# Altium PCB AT-kdFCU.PcbDoc (part 1 of 2)
Units mm, origin at the board's own origin, x right, y up, seen from the top; angles counter-clockwise.
Board outline 40 x 40 mm, 4 copper layers (Top Layer, GND, POWER, Bottom Layer), stack 0.603 mm thick; 137 components, 117 nets, 527 pads, 186 vias.
Unrouted connection lines stored in the file: 1.
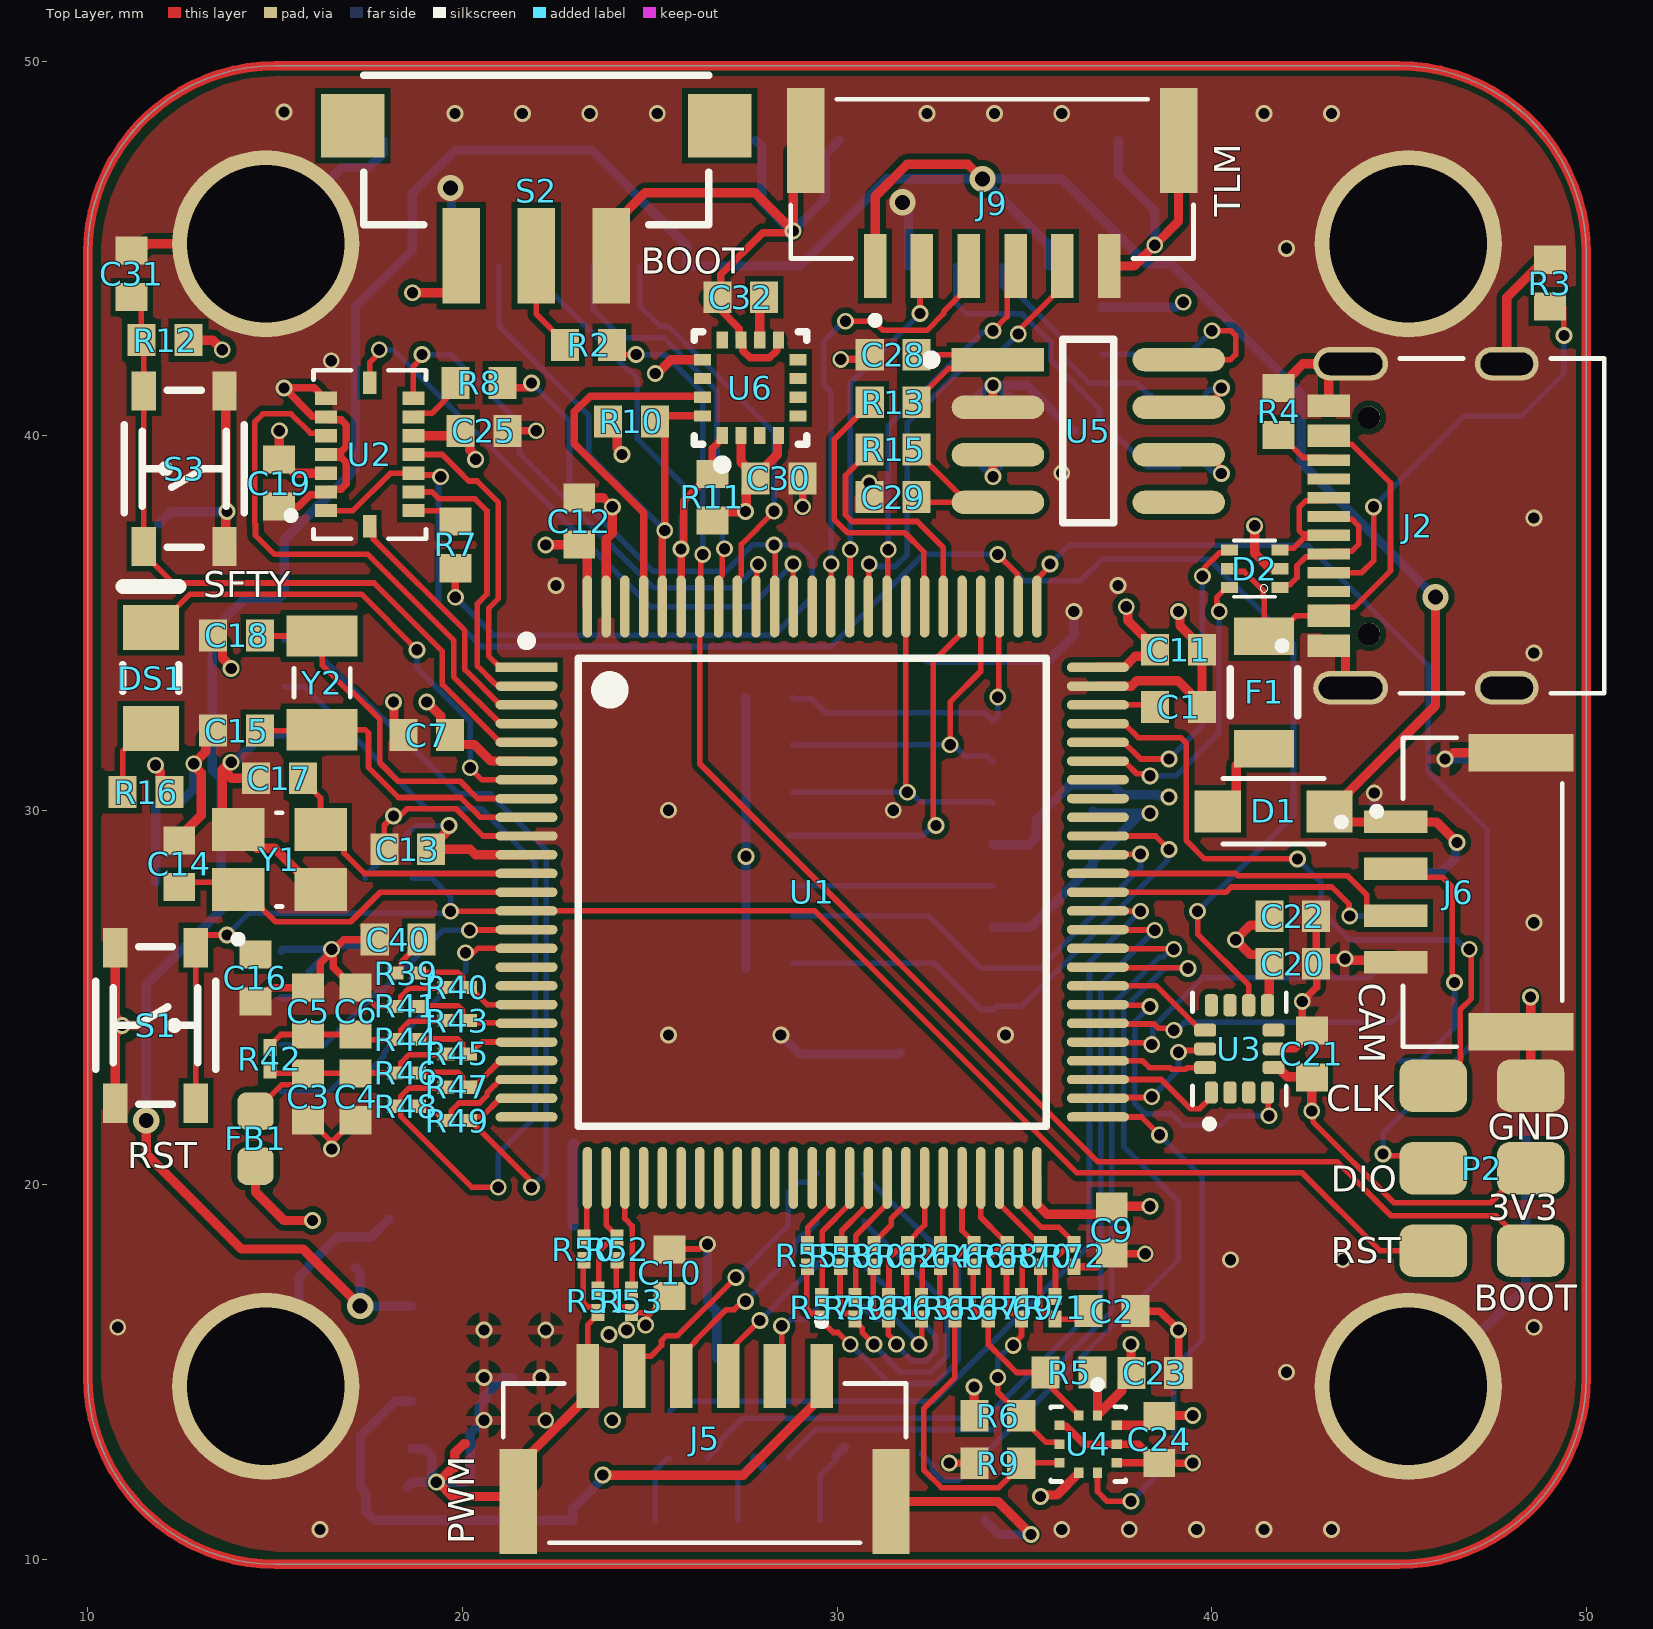
[diagram p0: Top Layer view]
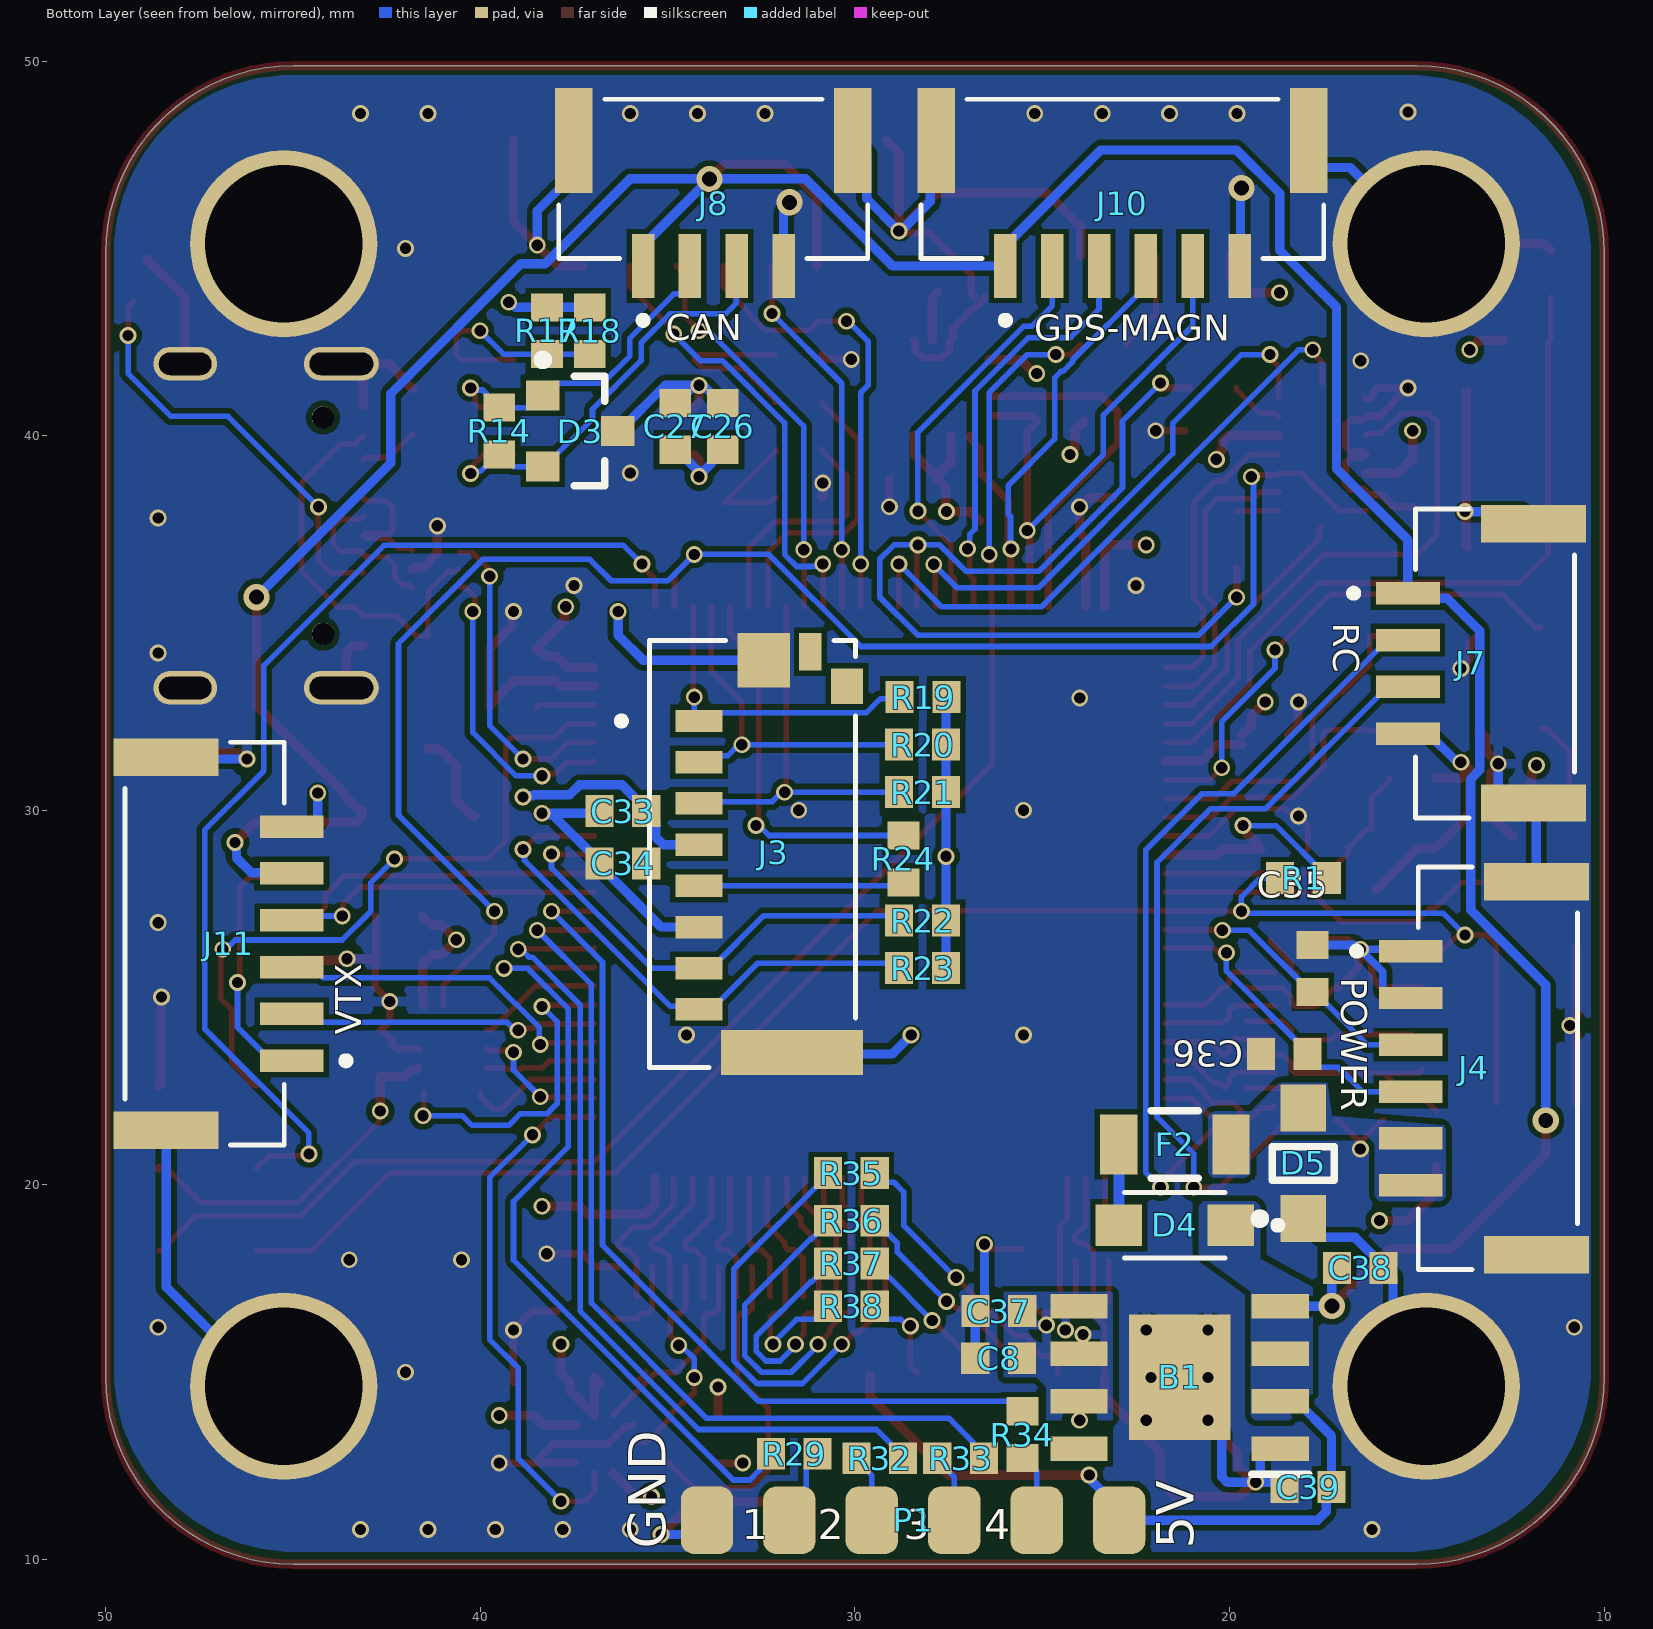
[diagram p1: Bottom Layer view, seen from below]
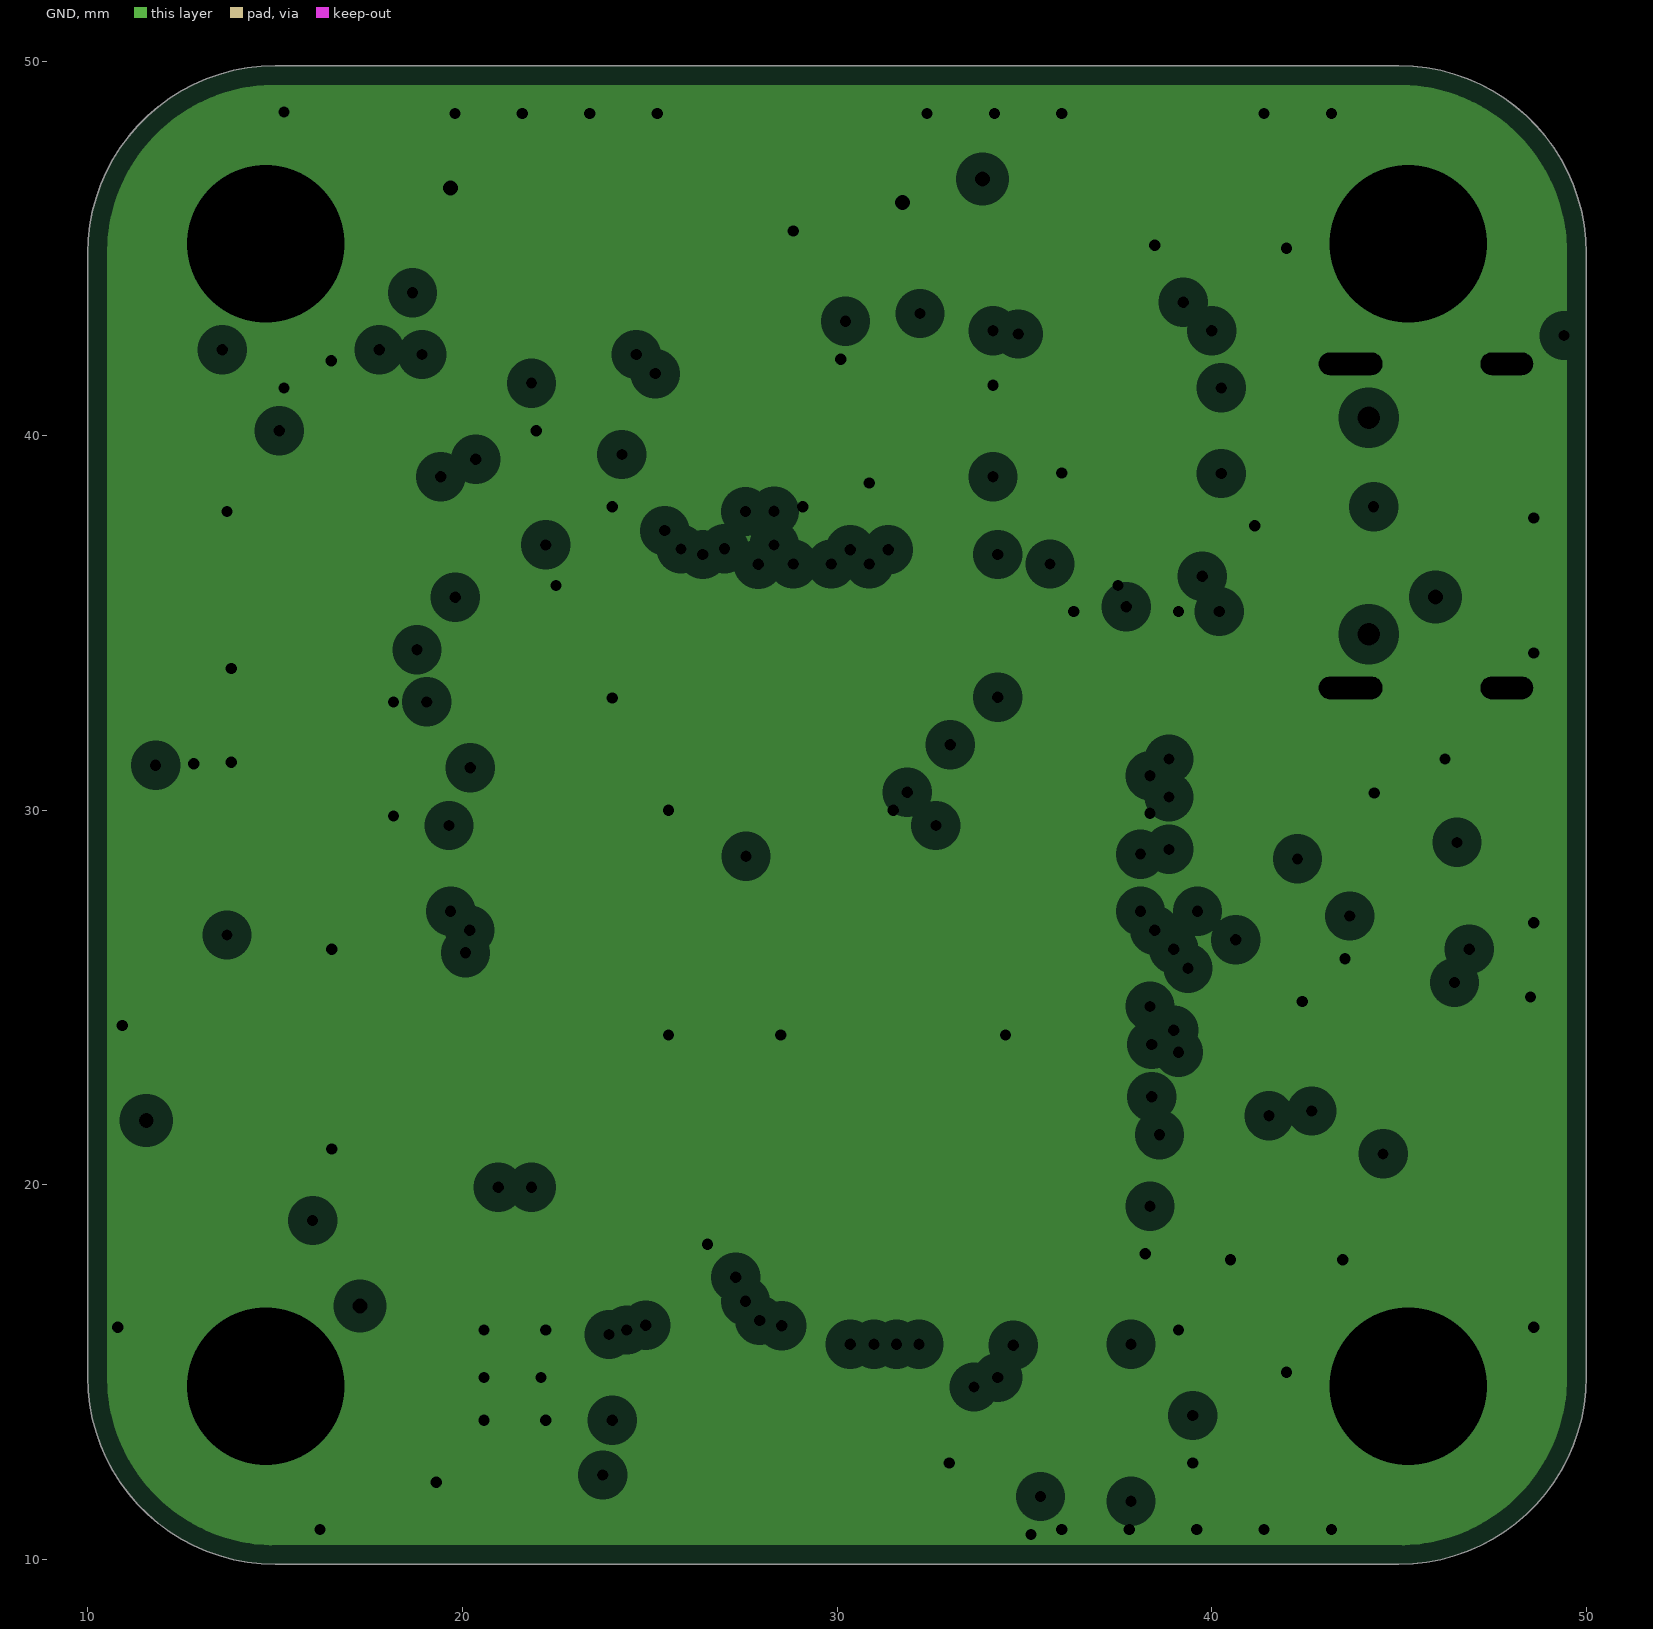
[diagram p2: GND, clearances drawn from the general rule]
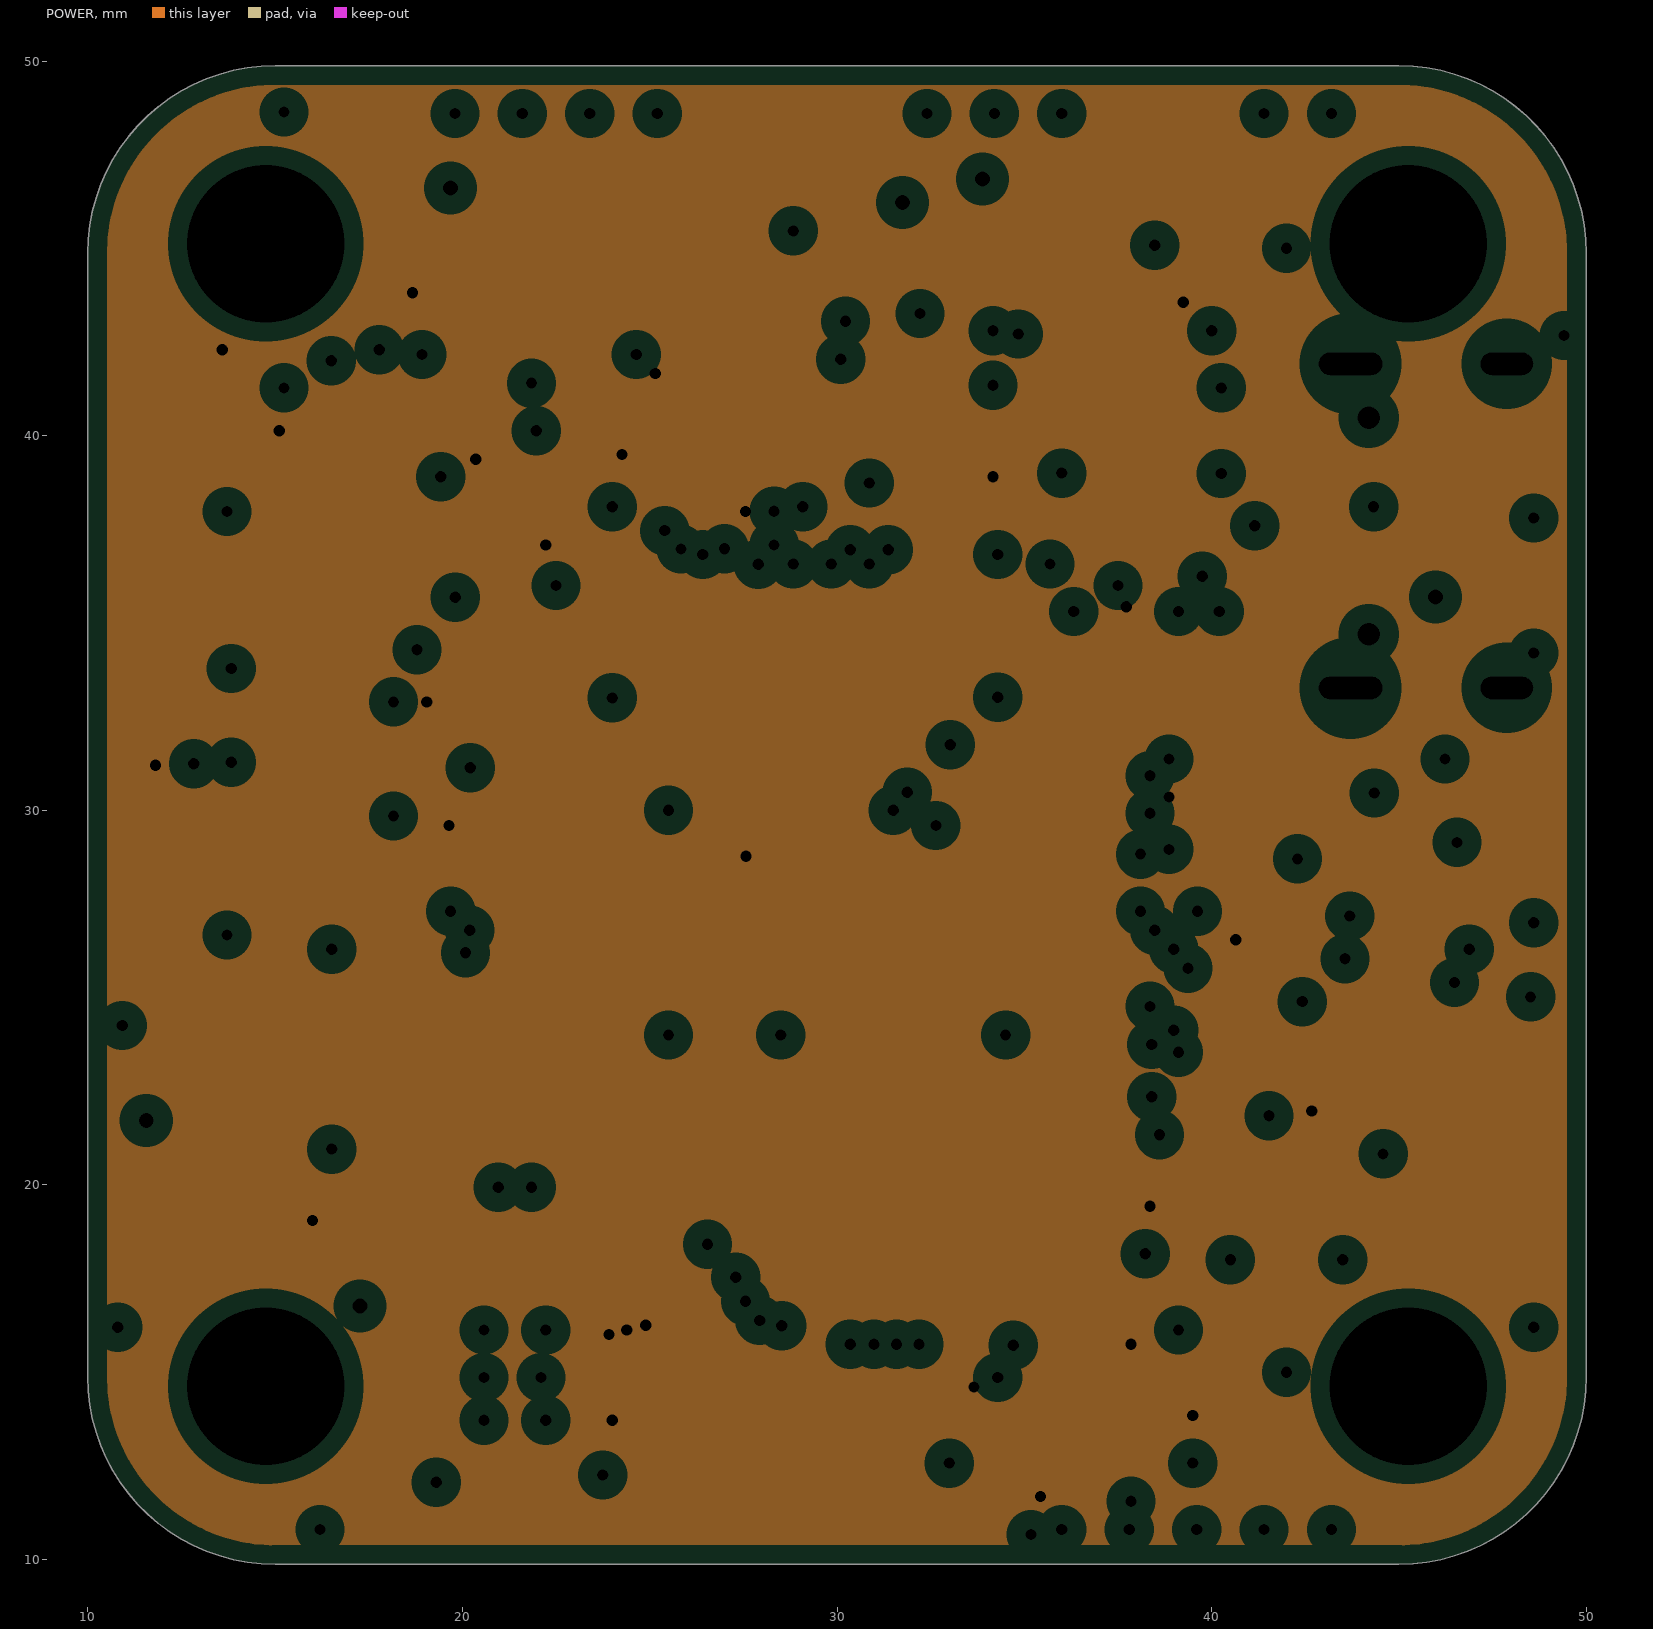
[diagram p3: POWER, clearances drawn from the general rule]
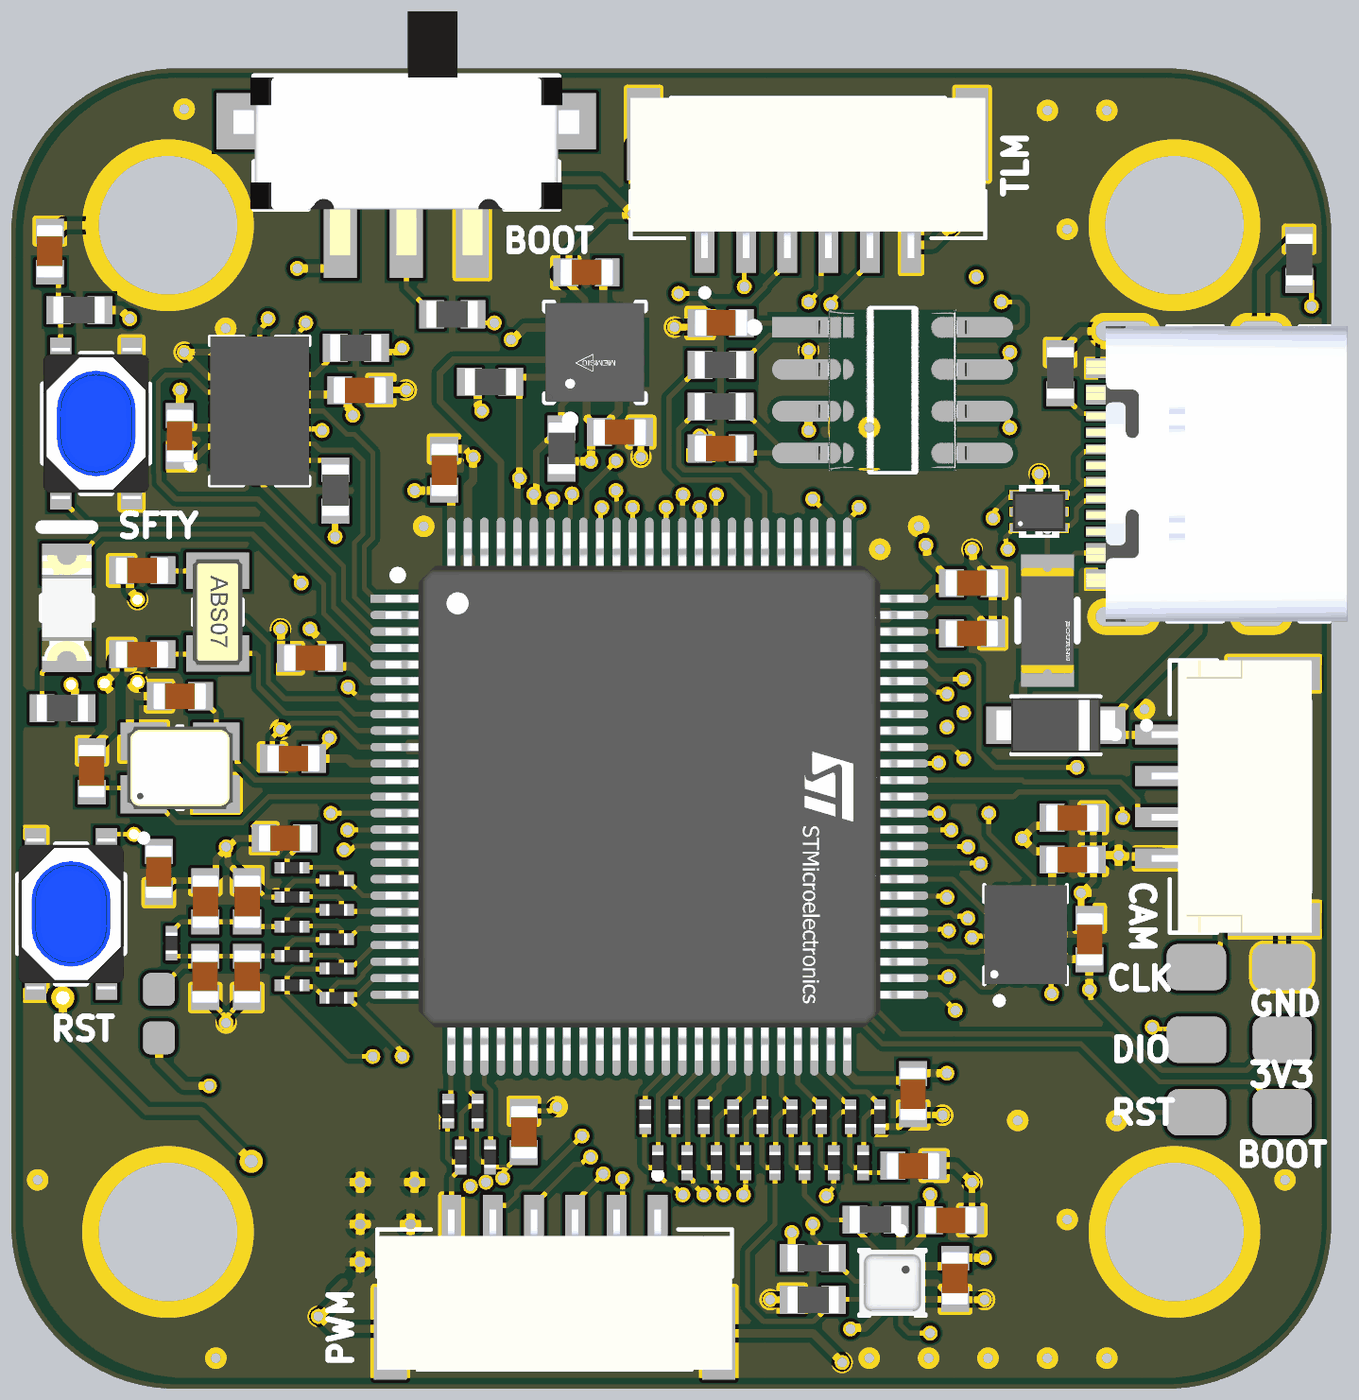
[diagram p5: 3D render of the assembled board from above, using the file's embedded part models]
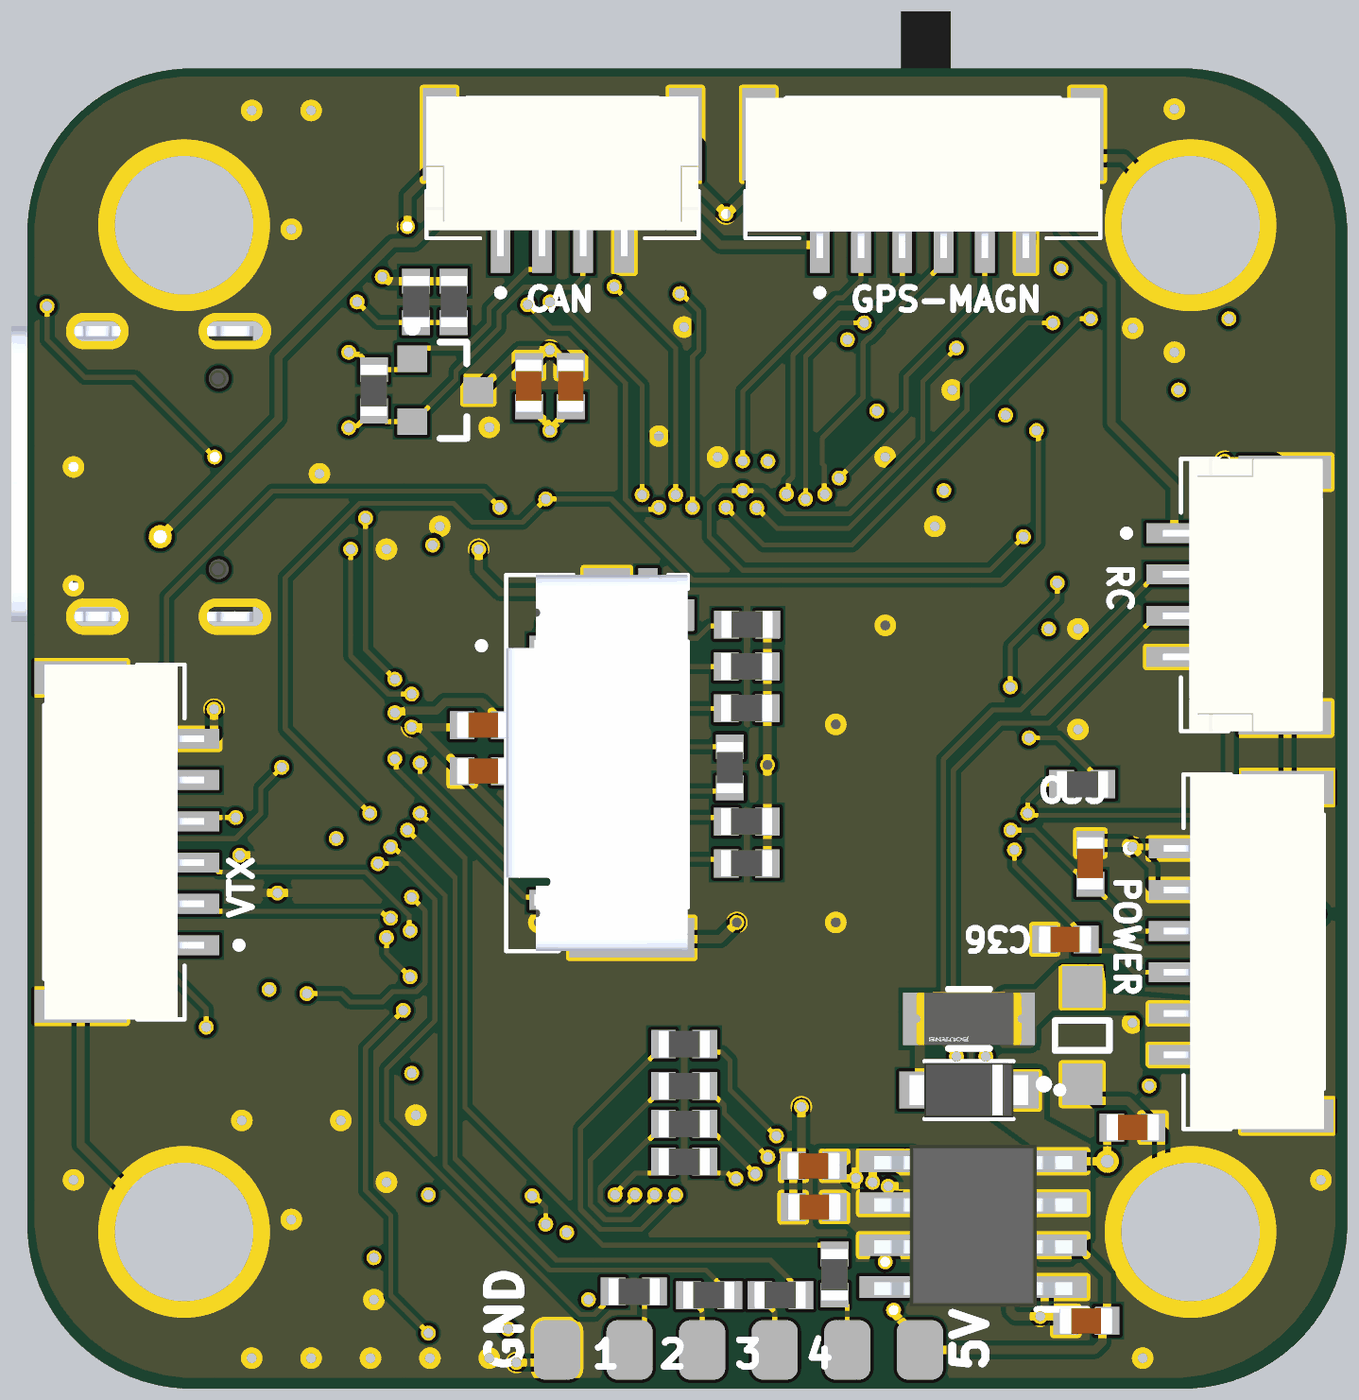
[diagram p6: 3D render of the assembled board from below, using the file's embedded part models]

## Layer stack, top to bottom
Top Solder: solder mask 0.0102, Solder Resist, Dk 3.5
Top Layer: signal copper 0.0356
Dielectric 2: prepreg 0.0711, PP-006, Dk 4.1
GND: plane copper 0.035, net GND
Dielectric 1: dielectric 0.32, FR-4, Dk 4.8
POWER: plane copper 0.035, net 3.3 V
Dielectric 3: prepreg 0.0711, PP-006, Dk 4.1
Bottom Layer: signal copper 0.0356
Bottom Solder: solder mask 0.0102, Solder Resist, Dk 3.5

## Board outline
10,14.873 10,44.873 cw(c15,44.873) 15,49.873 45,49.873 cw(c45,44.873) 50,44.873 50,14.873 cw(c45,14.873) 45,9.873 15,9.873 cw(c15,14.873)

## Design rules (kind name [scope] priority, off if disabled: settings)
Clearance [All] p1: gap=0.15 ignorepadtopadclearanceinfootprint=FALSE
Clearance Clearance_1 [All] p2: gap=0.254 ignorepadtopadclearanceinfootprint=FALSE except(0: Arc-Hole Track-Hole SMDPad-Hole THPad-Hole Via-Hole Fill-Hole Poly-Hole Region-Hole Text-Hole)
PlaneClearance [All] p1: clearance=0.508
PlaneConnect [All] p1: planeconnectstyle=Relief reliefexpansion=0.508 reliefentries=4 reliefconductorwidth=0.254 reliefairgap=0.254
PolygonConnect [All] p1: connectstyle=Direct reliefconductorwidth=0.254 reliefentries=4 polygonreliefangle="90 Angle" airgapwidth=0.254
RoutingVias [All] p1: holewidth=0.3 width=0.6 viastyle="Through Hole" minholewidth=0.2 minwidth=0.4 maxholewidth=0.6 maxwidth=1.2
SolderMaskExpansion [All] p1: expansion=0.102 istentingtop=FALSE
Width [All] p1: maxlimit=0.3 minlimit=0.1 preferedwidth=0.25
28 further rules are at their usual default settings.

## Classes and differential pairs
component class AT-kdSENS: C19 C20 C21 C22 C23 C24 C25 C26 C27 C28 C29 C30 C31 C32 C33 C34 D3 DS1 J3 R5 R6 R7 R8 R9 R10 R11 R12 R13 R14 R15 R16 R17 R18 R19 R20 R21 R22 R23 R24 S3 U2 U3 U4 U5 U6
component class AT-kdCONN: B1 C35 C37 C38 C39 C40 D4 D5 F2 FB1 J4 J5 J6 J7 J8 J9 J10 J11 P1 R29 R32 R33 R34 R35 R36 R37 R38 R39 R40 R41 R42 R43 R44 R45 R46 R47 R48 R49 R50 R51 R52 R53 R55 R57 R58 R59 R60 R61 R62 R63 R64 R65 R66 R67 R68 R69 R70 R71 R72
component class AT-kdFCU: C1 C2 C3 C4 C5 C6 C7 C8 C9 C10 C11 C12 C13 C14 C15 C16 C17 C18 D1 D2 F1 J2 P2 R1 R2 R3 R4 S1 S2 U1 Y1 Y2

## Components (designator, comment, footprint, x,y, rotation, side; value= is the part's Value field where it differs from the comment)
B1 "AP7362A-33SP-13" SOIC127P600X150-9N 21.336,14.859 r0 bottom
C1 "2.2uF" Capacitor-0603 39.116,32.766 r180 top
C2 "2.2uF" Capacitor-0603 37.338,16.637 r180 top
C3 "1uF" Capacitor-0603 15.885,22.352 r90 top
C4 "0.1uF" Capacitor-0603 17.155,22.352 r90 top
C5 "1uF" Capacitor-0603 15.875,24.638 r270 top
C6 "0.1uF" Capacitor-0603 17.145,24.638 r270 top
C7 "0.1uF" Capacitor-0603 19.05,32.004 r0 top
C8 "4.7uF" Capacitor-0603 26.162,15.367 r180 bottom
C9 "0.1uF" Capacitor-0603 37.338,18.796 r90 top
C10 "0.1uF" Capacitor-0603 25.527,17.653 r270 top
C11 "0.1uF" Capacitor-0603 39.116,34.29 r180 top
C12 "0.1uF" Capacitor-0603 23.114,37.719 r270 top
C13 "0.1uF" Capacitor-0603 18.542,28.956 r0 top
C14 "15pF" Capacitor-0603 12.446,28.575 r90 top
C15 "4.7pF" Capacitor-0603 13.97,32.131 r180 top
C16 "0.1uF" Capacitor-0603 14.478,25.527 r90 top
C17 "15pF" Capacitor-0603 15.113,30.861 r180 top
C18 "4.7pF" Capacitor-0603 13.97,34.671 r180 top
C19 "0.1uF" Capacitor-0603 15.113,38.735 r90 top
C20 "0.1uF" Capacitor-0603 42.164,25.908 r180 top
C21 "2.2uF" Capacitor-0603 42.672,23.495 r270 top
C22 "10nF" Capacitor-0603 42.164,27.178 r180 top
C23 "0.1uF" Capacitor-0603 38.481,14.986 r180 top
C24 "0.1uF" Capacitor-0603 38.608,13.208 r90 top
C25 "0.1uF" Capacitor-0603 20.574,40.132 r180 top
C26 "1uF" Capacitor-0603 33.523,40.251 r90 bottom
C27 "1uF" Capacitor-0603 34.793,40.251 r90 bottom
C28 "10nF" Capacitor-0603 31.501,42.156 r0 top
C29 "10nF" Capacitor-0603 31.496,38.354 r0 top
C30 "1uF" Capacitor-0603 28.448,38.862 r180 top
C31 "0.1uF" Capacitor-0603 11.176,44.323 r90 top
C32 "10uF" Capacitor-0603 27.432,43.688 r0 top
C33 "1uF" Capacitor-0603 36.195,29.972 r180 bottom
C34 "0.1uF" Capacitor-0603 36.195,28.575 r180 bottom
C35 "0.1uF" Capacitor-0603 17.78,25.781 r90 bottom
C36 "0.1uF" Capacitor-0603 18.542,23.495 r0 bottom
C37 "10uF" Capacitor-0603 26.162,16.637 r0 bottom
C38 "0.1uF" Capacitor-0603 16.51,17.78 r180 bottom
C39 "10uF" Capacitor-0603 17.907,11.938 r0 bottom
C40 "0.1uF" Capacitor-0603 18.288,26.543 r0 top
D1 "sch" SODFL3619X98N 41.656,29.972 r180 top
D2 "NUF2042XV6T1G" SOT-563 41.148,36.449 r90 top
D3 "TVS" ONSC-SOT-23-3-318-08_V 37.333,40.124 r180 bottom
D4 "sch" SODFL3619X98N 21.463,18.923 r0 bottom
D5 "tvs" ONSC-SOD-123FL-2-498_V 18.034,20.574 r90 bottom
DS1 "SML-LX1206YC-TR" LUMX-SML-LX1206YC-TR_V 11.684,33.528 r90 top
F1 "fuse" FP-MF-NSMF012-2-MFG 41.402,33.147 r270 top value=1.35-8.5Ω
F2 "fuse" FP-MF-NSMF012-2-MFG 21.463,21.082 r0 bottom value=1.35-8.5Ω
FB1 "100 Ohms @ 100 MHz" BEADC1608X75N 14.478,21.236 r90 top
J2 "TYPE-C-31-M-12" HRO_TYPE-C-31-M-12 47.879,37.592 r90 top
J3 "10067099-200LF" AMPHENOL_10067099-200LF 32.738,28.833 r90 bottom
J4 "BM06B-GHS-TBT(LF)(SN)(N)" JST_BM06B-GHS-TBT(LF)(SN)(N) 11.811,23.114 r90 bottom
J5 "BM06B-GHS-TBT(LF)(SN)(N)" JST_BM06B-GHS-TBT(LF)(SN)(N) 26.466,11.55 r0 top
J6 "BM04B-GHS-TBT(LF)(SN)(N)" JST_BM04B-GHS-TBT(LF)(SN)(N) 48.26,27.813 r90 top
J7 "BM04B-GHS-TBT(LF)(SN)(N)" JST_BM04B-GHS-TBT(LF)(SN)(N) 11.89,33.919 r90 bottom
J8 "BM04B-GHS-TBT(LF)(SN)(N)" JST_BM04B-GHS-TBT(LF)(SN)(N) 33.782,47.879 r0 bottom
J9 "BM06B-GHS-TBT(LF)(SN)(N)" JST_BM06B-GHS-TBT(LF)(SN)(N) 34.141,47.879 r180 top
J10 "BM06B-GHS-TBT(LF)(SN)(N)" JST_BM06B-GHS-TBT(LF)(SN)(N) 22.86,47.879 r0 bottom
J11 "BM06B-GHS-TBT(LF)(SN)(N)" JST_BM06B-GHS-TBT(LF)(SN)(N) 48.387,26.438 r270 bottom
P1 "Pad-6Pos" "Pad-6 Pos" 33.95,11.049 r180 bottom
P2 "Pad-3x2" Pad-3x2 45.914,18.247 r90 top
R1 "10K" Resistor-0603 18.034,28.194 r0 bottom
R2 "10K" Resistor-0603 23.368,42.418 r0 top
R3 "5.1K" Resistor-0603 49.022,44.069 r270 top
R4 "5.1K" Resistor-0603 41.783,40.64 r270 top
R5 "4.7K" Resistor-0603 36.195,14.986 r0 top
R6 "4.7K" Resistor-0603 34.29,13.843 r180 top
R7 "22 Ohm" Resistor-0603 19.812,37.084 r270 top
R8 "22 Ohm" Resistor-0603 20.447,41.402 r0 top
R9 "4.7K" Resistor-0603 34.29,12.573 r180 top
R10 "2.7K" Resistor-0603 24.511,40.386 r180 top
R11 "2.7K" Resistor-0603 26.67,38.354 r270 top
R12 "10K" Resistor-0603 12.065,42.545 r0 top
R13 "47 Ohm" Resistor-0603 31.501,40.886 r0 top
R14 "120 Ohm" Resistor-0603 39.492,40.124 r90 bottom
R15 "47 Ohm" Resistor-0603 31.496,39.624 r0 top
R16 "500 Ohm" Resistor-0603 11.557,30.48 r0 top
R17 "0 DNS" Resistor-0603 38.227,42.799 r270 bottom
R18 "0 Ohm" Resistor-0603 37.084,42.799 r270 bottom
R19 "4.7K" Resistor-0603 28.182,33.015 r180 bottom
R20 "4.7K" Resistor-0603 28.194,31.75 r180 bottom
R21 "4.7K" Resistor-0603 28.194,30.48 r180 bottom
R22 "4.7K" Resistor-0603 28.194,27.051 r180 bottom
R23 "4.7K" Resistor-0603 28.194,25.781 r180 bottom
R24 "47 Ohm" Resistor-0603 28.702,28.702 r90 bottom
R29 "47 Ohm" Resistor-0603 31.623,12.827 r0 bottom
R32 "47 Ohm" Resistor-0603 29.337,12.7 r180 bottom
R33 "47 Ohm" Resistor-0603 27.178,12.7 r180 bottom
R34 "47 Ohm" Resistor-0603 25.527,13.335 r90 bottom
R35 "47 Ohm" Resistor-0603 30.099,20.32 r0 bottom
R36 "47 Ohm" Resistor-0603 30.099,19.05 r0 bottom
R37 "47 Ohm" Resistor-0603 30.099,17.907 r0 bottom
R38 "47 Ohm" Resistor-0603 30.099,16.764 r0 bottom
R39 "CRCW02010000Z0ED" RESC0603X28X15NL5T05 18.507,25.654 r0 top
R40 "CRCW02010000Z0ED" RESC0603X28X15NL5T05 19.858,25.273 r0 top
R41 "CRCW02010000Z0ED" RESC0603X28X15NL5T05 18.507,24.765 r0 top
R42 "CRCW02010000Z0ED" RESC0603X28X15NL5T05 14.859,23.368 r90 top
R43 "CRCW02010000Z0ED" RESC0603X28X15NL5T05 19.858,24.384 r0 top
R44 "CRCW02010000Z0ED" RESC0603X28X15NL5T05 18.507,23.876 r0 top
R45 "CRCW02010000Z0ED" RESC0603X28X15NL5T05 19.858,23.495 r0 top
R46 "CRCW02010000Z0ED" RESC0603X28X15NL5T05 18.507,22.987 r0 top
R47 "CRCW02010000Z0ED" RESC0603X28X15NL5T05 19.858,22.606 r0 top
R48 "CRCW02010000Z0ED" RESC0603X28X15NL5T05 18.507,22.098 r0 top
R49 "CRCW02010000Z0ED" RESC0603X28X15NL5T05 19.858,21.717 r180 top
R50 "CRCW02010000Z0ED" RESC0603X28X15NL5T05 23.241,18.288 r90 top
R51 "CRCW02010000Z0ED" RESC0603X28X15NL5T05 23.622,16.891 r90 top
R52 "CRCW02010000Z0ED" RESC0603X28X15NL5T05 24.13,18.288 r90 top
R53 "CRCW02010000Z0ED" RESC0603X28X15NL5T05 24.511,16.891 r90 top
R55 "CRCW02010000Z0ED" RESC0603X28X15NL5T05 29.21,18.115 r90 top
R57 "CRCW02010000Z0ED" RESC0603X28X15NL5T05 29.591,16.718 r90 top
R58 "CRCW02010000Z0ED" RESC0603X28X15NL5T05 30.099,18.115 r90 top
R59 "CRCW02010000Z0ED" RESC0603X28X15NL5T05 30.48,16.718 r90 top
R60 "CRCW02010000Z0ED" RESC0603X28X15NL5T05 30.988,18.115 r90 top
R61 "CRCW02010000Z0ED" RESC0603X28X15NL5T05 31.369,16.718 r90 top
R62 "CRCW02010000Z0ED" RESC0603X28X15NL5T05 31.877,18.115 r90 top
R63 "CRCW02010000Z0ED" RESC0603X28X15NL5T05 32.258,16.718 r90 top
R64 "CRCW02010000Z0ED" RESC0603X28X15NL5T05 32.766,18.115 r90 top
R65 "CRCW02010000Z0ED" RESC0603X28X15NL5T05 33.147,16.718 r90 top
R66 "CRCW02010000Z0ED" RESC0603X28X15NL5T05 33.655,18.115 r90 top
R67 "CRCW02010000Z0ED" RESC0603X28X15NL5T05 34.036,16.718 r90 top
R68 "CRCW02010000Z0ED" RESC0603X28X15NL5T05 34.544,18.115 r90 top
R69 "CRCW02010000Z0ED" RESC0603X28X15NL5T05 34.925,16.718 r90 top
R70 "CRCW02010000Z0ED" RESC0603X28X15NL5T05 35.433,18.115 r90 top
R71 "CRCW02010000Z0ED" RESC0603X28X15NL5T05 35.814,16.718 r90 top
R72 "CRCW02010000Z0ED" RESC0603X28X15NL5T05 36.322,18.115 r90 top
S1 "PTS810 SJM 250 SMTR LFS" button 11.811,24.257 r270 top
S2 "slideSwitch" switch 21.971,47.625 r270 top
S3 "PTS810 SJM 250 SMTR LFS" button 12.573,39.116 r90 top
U1 "STM32F765VGT6" FP-LQFP100-1L-IPC_B 29.337,27.813 r0 top
U2 "BMI088" PQFN50P450X300X100-16N 17.526,39.497 r90 top
U3 "ICM-42688-P" PQFN50P300X250X97-14N 40.741,23.63 r90 top
U4 "BMP390L" XDCR_BMP390L 36.703,13.081 r0 top
U5 "SN65HVD230DR" FP-D0008A-IPC_A 36.708,40.124 r0 top
U6 "MMC5983MA" Memsic_0_MFG 27.686,41.275 r90 top
Y1 "24 MHz" XTAL_TSX-3225_25.0000MF10P-C3 15.113,28.682 r90 top
Y2 "32 KHz" XTAL_ABS07-32.768KHZ-7-T 16.256,33.401 r270 top

## Footprints (in the part's own frame and the unit in brackets; to place one, negate y for a bottom-side part, rotate by r counter-clockwise, add the part's x,y. Pads: shape width x height; smd on the part's side, far side on the other; paste and mask are expansions set on the pad)
AMPHENOL_10067099-200LF [mm]
  rect 0.6x1.25 smd: 1(3.55,1.425) 2(2.45,1.425) 3(1.35,1.425) 4(0.25,1.425) 5(-0.85,1.425) 6(-1.95,1.425) 7(-3.05,1.425) 8(-4.15,1.425)
  rect 0.95x0.85 smd: DET_1(4.475,-2.525)
  rect 1x0.6 smd: DET_2(5.4,-1.55)
  rect 1.2x3.79 smd: S1(-5.3,-1.055)
  rect 1.45x1.4 smd: S2(5.175,-0.3)
  silkscreen extent -5.7,-2.75 5.7,3.6, body extent -5.7,-2.75 5.7,2.75, height 2.65
BEADC1608X75N [mm]
  rrect50% 1x0.97 smd: 1(-0.735,0) 2(0.735,0)
button [mm] "T-Switch, 4-leads, body 4.2x3.2mm, C&K PTS810 SJM 250 SMTR LFS"
  rect 1.05x0.65 smd mask+0.1: 1(-2.075,1.075) 2(2.075,1.075) 3(-2.075,-1.075) 4(2.075,-1.075)
  silkscreen extent -2.1,-1.6 2.1,1.6, body extent -2.29,-1.6 2.29,1.6, height 2.7
Capacitor-0603 [mm]
  rect 0.75x0.85 smd: 1(-0.627,0.005) 2(0.623,0.005)
  body extent -0.79,-0.39 0.81,0.41, height 0.9
FP-D0008A-IPC_A [mm]
  rect 2.469x0.622 smd paste+0 mask+0: 1(-2.414,1.905)
  rrect100% 2.469x0.622 smd paste+0 mask+0: 2(-2.414,0.635) 3(-2.414,-0.635) 4(-2.414,-1.905) 5(2.414,-1.905) 6(2.414,-0.635) 7(2.414,0.635) 8(2.414,1.905)
  silkscreen extent -4.32,-2.45 0.68,2.45, body extent -4.15,-2.95 4.15,2.95, height 0.25
FP-LQFP100-1L-IPC_B [mm]
  rect 1.655x0.252 smd paste+0 mask+0: 1(-7.625,6)
  rrect100% 1.655x0.252 smd paste+0 mask+0: 2(-7.625,5.5) 3(-7.625,5) 4(-7.625,4.5) 5(-7.625,4) 6(-7.625,3.5) 7(-7.625,3) 8(-7.625,2.5) 9(-7.625,2) 10(-7.625,1.5) 11(-7.625,1) 12(-7.625,0.5) 13(-7.625,0) 14(-7.625,-0.5) 15(-7.625,-1) 16(-7.625,-1.5) 17(-7.625,-2) 18(-7.625,-2.5) 19(-7.625,-3) 20(-7.625,-3.5) 21(-7.625,-4) 22(-7.625,-4.5) 23(-7.625,-5) 24(-7.625,-5.5) 25(-7.625,-6) 51(7.625,-6) 52(7.625,-5.5) 53(7.625,-5) 54(7.625,-4.5) 55(7.625,-4) 56(7.625,-3.5) 57(7.625,-3) 58(7.625,-2.5) 59(7.625,-2) 60(7.625,-1.5) 61(7.625,-1) 62(7.625,-0.5) 63(7.625,0) 64(7.625,0.5) 65(7.625,1) 66(7.625,1.5) 67(7.625,2) 68(7.625,2.5) 69(7.625,3) 70(7.625,3.5) 71(7.625,4) 72(7.625,4.5) 73(7.625,5) 74(7.625,5.5) 75(7.625,6)
  rrect100% 0.252x1.655 smd paste+0 mask+0: 26(-6,-7.625) 27(-5.5,-7.625) 28(-5,-7.625) 29(-4.5,-7.625) 30(-4,-7.625) 31(-3.5,-7.625) 32(-3,-7.625) 33(-2.5,-7.625) 34(-2,-7.625) 35(-1.5,-7.625) 36(-1,-7.625) 37(-0.5,-7.625) 38(0,-7.625) 39(0.5,-7.625) 40(1,-7.625) 41(1.5,-7.625) 42(2,-7.625) 43(2.5,-7.625) 44(3,-7.625) 45(3.5,-7.625) 46(4,-7.625) 47(4.5,-7.625) 48(5,-7.625) 49(5.5,-7.625) 50(6,-7.625) 76(6,7.625) 77(5.5,7.625) 78(5,7.625) 79(4.5,7.625) 80(4,7.625) 81(3.5,7.625) 82(3,7.625) 83(2.5,7.625) 84(2,7.625) 85(1.5,7.625) 86(1,7.625) 87(0.5,7.625) 88(0,7.625) 89(-0.5,7.625) 90(-1,7.625) 91(-1.5,7.625) 92(-2,7.625) 93(-2.5,7.625) 94(-3,7.625) 95(-3.5,7.625) 96(-4,7.625) 97(-4.5,7.625) 98(-5,7.625) 99(-5.5,7.625) 100(-6,7.625)
  silkscreen extent -7.75,-6.25 6.25,6.83, body extent -8.7,-8.7 8.7,8.7, height 0.25
FP-MF-NSMF012-2-MFG [mm]
  rect 1x1.6 smd paste+0 mask+0: 1(-1.5,0) 2(1.5,0)
  silkscreen extent -0.63,-0.9 0.63,0.9, body extent -2.1,-1 2.1,1, height 0.25
HRO_TYPE-C-31-M-12 [mm]
  rect 0.6x1.14 smd mask+0.05: A1_B12(-3.2,4.75) A4_B9(-2.4,4.75) B1_A12(3.2,4.75) B4_A9(2.4,4.75)
  rect 0.3x1.14 smd mask+0.05: A5(-1.25,4.75) A6(-0.25,4.75) A7(0.25,4.75) A8(1.25,4.75) B5(1.75,4.75) B6(0.75,4.75) B7(-0.75,4.75) B8(-1.75,4.75)
  oval 0.9x2 hole 0.6 slot 1.7 at 90 deg: S1(-4.325,4.17) S2(4.325,4.17)
  oval 0.9x1.7 hole 0.6 slot 1.4 at 90 deg: S3(-4.325,0) S4(4.325,0)
  round 0.6 hole 0.6 unplated: ""(-2.89,3.68) ""(2.89,3.68)
  silkscreen extent -4.47,-2.6 4.47,6.1, body extent -4.47,-2.6 4.47,5.31, height 3.31
JST_BM04B-GHS-TBT(LF)(SN)(N) [mm]
  rect 0.6x1.7 smd: 1(1.875,3.35) 2(0.625,3.35) 3(-0.625,3.35) 4(-1.875,3.35)
  rect 1x2.8 smd: S1(-3.725,0) S2(3.725,0)
  silkscreen extent -4.13,-1.1 4.13,4.9, body extent -4.13,-1.15 4.13,3.7, height 4.35
JST_BM06B-GHS-TBT(LF)(SN)(N) [mm]
  rect 0.6x1.7 smd: 1(3.125,3.35) 2(1.875,3.35) 3(0.625,3.35) 4(-0.625,3.35) 5(-1.875,3.35) 6(-3.125,3.35)
  rect 1x2.8 smd: S1(-4.975,0) S2(4.975,0)
  silkscreen extent -5.38,-1.1 5.38,4.9, body extent -5.37,-1.1 5.38,3.75, height 4.07
LUMX-SML-LX1206YC-TR_V [mm] "SMD, 2-Leads, Body 3.2x1.5mm"
  rect 1.2x1.5 smd: 1(-1.35,0) 2(1.35,0)
  silkscreen extent -0.35,-0.75 2.45,0.75, body extent -1.6,-0.75 1.6,0.75, height 1.1
Memsic_0_MFG [mm]
  rect 0.45x0.3 smd paste+0 mask+0: 1(-1.275,0.75) 2(-1.275,0.25) 3(-1.275,-0.25) 4(-1.275,-0.75) 9(1.275,-0.75) 10(1.275,-0.25) 11(1.275,0.25) 12(1.275,0.75)
  rect 0.3x0.45 smd paste+0 mask+0: 5(-0.75,-1.275) 6(-0.25,-1.275) 7(0.25,-1.275) 8(0.75,-1.275) 13(0.75,1.275) 14(0.25,1.275) 15(-0.25,1.275) 16(-0.75,1.275)
  silkscreen extent -2.17,-1.5 1.5,1.5, body extent -2,-2 2,2, height 0.25
ONSC-SOD-123FL-2-498_V [mm] "SOD, 2-Leads, Body 2.7x1.65mm"
  rect 1.25x1.22 smd: 1(-1.475,0) 2(1.475,0)
  silkscreen extent -1.6,-0.82 0.45,1.29, body extent -1.35,-0.82 1.35,0.82, height 0.98
ONSC-SOT-23-3-318-08_V [mm] "SOT23, 3-Leads, Body 2.92x1.3mm, Pitch 0.95mm"
  rect 0.9x0.8 smd: 1(-1,0.95) 2(-1,-0.95) 3(1,0)
  silkscreen extent -1.13,-1.46 0.65,2.02, body extent -0.65,-1.46 0.65,1.46, height 1.11
Pad-3x2 [mm]
  rrect50% 1.4x1.8 smd: 1(0,0) 2(2.2,0) 3(4.4,0) 4(0,-2.6) 5(2.2,-2.6) 6(4.4,-2.6)
"Pad-6 Pos" [mm]
  rrect50% 1.4x1.8 smd: 1(0,0) 2(2.2,0) 3(4.4,0) 4(6.6,0) 5(8.8,0) 6(11,0)
PQFN50P300X250X97-14N [mm]
  rrect50% 0.59x0.35 smd mask+0: 1(-1.165,0.75) 2(-1.165,0.25) 3(-1.165,-0.25) 4(-1.165,-0.75) 8(1.165,-0.75) 9(1.165,-0.25) 10(1.165,0.25) 11(1.165,0.75)
  rrect50% 0.35x0.59 smd mask+0: 5(-0.5,-0.915) 6(0,-0.915) 7(0.5,-0.915) 12(0.5,0.915) 13(0,0.915) 14(-0.5,0.915)
  silkscreen extent -2.1,-1.25 1.5,1.25, body extent -1.5,-1.25 1.5,1.25, height 0.97
PQFN50P450X300X100-16N [mm]
  rect 0.35x0.59 smd: 1(-1.5,1.165) 2(-1,1.165) 3(-0.5,1.165) 4(0,1.165) 5(0.5,1.165) 6(1,1.165) 7(1.5,1.165) 9(1.5,-1.165) 10(1,-1.165) 11(0.5,-1.165) 12(0,-1.165) 13(-0.5,-1.165) 14(-1,-1.165) 15(-1.5,-1.165)
  rect 0.59x0.35 smd: 8(1.915,0) 16(-1.915,0)
  silkscreen extent -2.25,-1.5 2.25,2.2, body extent -2.25,-1.5 2.25,1.5, height 1
RESC0603X28X15NL5T05 [mm] "Chip Resistor, 2-Leads, Body 0.65x0.35mm, IPC Medium Density"
  rect 0.45x0.35 smd: 1(-0.3,0) 2(0.3,0)
  body extent -0.33,-0.18 0.33,0.18, height 0.28
Resistor-0603 [mm]
  rect 0.75x0.85 smd: 1(-0.627,0.005) 2(0.623,0.005)
  body extent -0.78,-0.39 0.76,0.41, height 0.6
SODFL3619X98N [mm]
  rect 1.24x1.12 smd: A(1.49,0) K(-1.49,0)
  silkscreen extent -2.85,-0.87 1.35,0.87, body extent -1.8,-0.82 1.8,0.82, height 0.98
SOIC127P600X150-9N [mm]
  rect 1.525x0.65 smd: 1(-2.688,1.905) 2(-2.688,0.635) 3(-2.688,-0.635) 4(-2.688,-1.905) 5(2.688,-1.905) 6(2.688,-0.635) 7(2.688,0.635) 8(2.688,1.905)
  rect 2.71x3.35 smd: 9(0,0)
  silkscreen extent -3.45,2.58 -1.92,2.58, body extent -3,-2.4 3,2.5, height 1.5
SOT-563 [mm]
  rect 0.3x0.45 smd paste-0.025 mask+0.025: 1(-0.5,-0.675) 2(0,-0.675) 3(0.5,-0.675) 4(0.5,0.675) 5(0,0.675) 6(-0.5,0.675)
  silkscreen extent -0.75,-0.55 0.75,0.55, body extent -0.8,-0.8 0.8,0.8, height 0.6
switch [mm]
  rect 2.55x1 smd: 1(2.825,-2) 2(2.825,0) 3(2.825,2)
  rect 1.7x1.7 smd: M(-0.65,4.9) M(-0.65,-4.9)
  silkscreen extent -2,-4.6 2,4.6, body extent -3.98,-5.25 3.42,5.25, height 2.9
XDCR_BMP390L [mm]
  rect 0.25x0.275 smd: 1(0.25,0.763) 2(-0.25,0.763) 6(-0.25,-0.763) 7(0.25,-0.763)
  rect 0.275x0.25 smd: 3(-0.763,0.5) 4(-0.763,0) 5(-0.763,-0.5) 8(0.763,-0.5) 9(0.763,0) 10(0.763,0.5)
  silkscreen extent -1,-1 1,1.69, body extent -1,-1 1,1, height 0.8
XTAL_ABS07-32.768KHZ-7-T [mm]
  rect 1.1x1.9 smd: 1(-1.25,0) 2(1.25,0)
  silkscreen extent -0.38,-0.75 0.38,0.75, body extent -1.6,-0.75 1.6,0.75, height 0.89
XTAL_TSX-3225_25.0000MF10P-C3 [mm]
  rect 1.15x1.4 smd: 1(-0.8,1.1) 2(-0.8,-1.1) 3(0.8,-1.1) 4(0.8,1.1)
  silkscreen extent -2.22,-0.08 1.25,1.2, body extent -1.25,-1.6 1.25,1.6, height 0.6

## Part data
B1: "LDO Voltage Regulators LDO CMOS HiCurr SO-8 1.5A LowQ Adj 190mV", Manufacturer_Name="Diodes Incorporated", Mouser Part Number=621-AP7362A-33SP-13, Arrow Part Number=AP7362A-33SP-13, Arrow Price/Stock=https://www.arrow.com/en/products/ap7362a-33sp-13/diodes-incorporated?utm_currency=USD&region=nac, Datasheet Link=https://www.diodes.com/assets/Datasheets/AP7362.pdf, Geometry.Height=1.5mm, Manufacturer_Part_Number=AP7362A-33SP-13, Mouser Price/Stock=https://www.mouser.co.uk/ProductDetail/Diodes-Incorporated/AP7362A-33SP-13?qs=M%2FOdCRO8QQ3CiX1oDLy5Bg%3D%3D
C1 C2 C3 C4 C5 C6 C7 C8 C9 C10 C11 C12 C13 C14 C15 C16 C17 C18 C19 C20 C21 C22 C23 C24 C25 C26 C27 C28 C29 C30 C31 C32 C33 C34 C35 C36 C37 C38 C39 C40: library part 0603-Cap
D1 D4: library part MBR230LSFT1G, "DIODE SCHOTTKY 30V 2A SOD123 MBR230LSTR", Package="SOD-123FL-2 ON Semiconductor", Check_prices=https://www.snapeda.com/parts/MBR230LSFT1G/Onsemi/view-part/?ref=eda, MF="ON Semiconductor", MP=MBR230LSFT1G, SnapEDA_Link=https://www.snapeda.com/parts/MBR230LSFT1G/Onsemi/view-part/?ref=snap
D2: "RC (Pi) EMI Filter 2nd Order Low Pass 2 Channel R = 22Ohms, C = 42pF (Total) SOT-563, SOT-666", Package="SOT-563-6 ON Semiconductor", Check_prices=https://www.snapeda.com/parts/NUF2042XV6T1G/Onsemi/view-part/?ref=eda, MF=onsemi, MP=NUF2042XV6T1G, SnapEDA_Link=https://www.snapeda.com/parts/NUF2042XV6T1G/Onsemi/view-part/?ref=snap
D3: library part CMP-1063-00164-1, "Dual Line CAN Bus Protector, 3-Pin SOT-23, Pb-Free, Tape and Reel", manufacturer="On Semiconductor", PartNumber=NUP2105LT1G, C Max (pF)=30, componentlink1description="Manufacturer URL", componentlink1url=http://www.onsemi.com/, componentlink2description=Datasheet, componentlink2url=http://www.onsemi.cn/pub_link/Collateral/NUP2105L-D.PDF, ComponentLink3Description="Package Specification", ComponentLink3URL=http://www.onsemi.cn/pub_link/Collateral/318-08.PDF, DatasheetVersion="Rev. 5", Direction=Bidirectional, Mounting Technology="Surface Mount", Number of Lines=2, PackageDescription="3-Pin Small Outline Transistor, Body 2.92 x 1.3 mm, Pitch 0.95 mm", PackageReference=SOT-23-3-318-08, PackageVersion="Rev. AP, 11/2009", Packing="Tape and Reel", PPK Max (W)=350, RoHS=Pb-Free, V(BR) Min (V)=26.2, IR Max (uA)=0.1
D5: library part CMP-1061-00612-1, "200 W Transient Voltage Suppressor, 2-Pin SOD-123FL, Pb-Free, Tape and Reel", manufacturer="On Semiconductor", PartNumber=SMF5.0AT1G, componentlink1description="Manufacturer URL", componentlink1url=http://www.onsemi.com/, componentlink2description=Datasheet, componentlink2url=http://www.onsemi.com/pub_link/Collateral/SMF5.0AT1-D.PDF, ComponentLink3Description="Package Specification", ComponentLink3URL=http://www.onsemi.com/pub_link/Collateral/498-01.PDF, DatasheetVersion="Rev. 7", Direction=Unidirectional, Mounting Technology="Surface Mount", PackageDescription="2-Pin SOD, Body 1.65 x 2.7 mm", PackageReference=SOD-123FL-2-498, PackageVersion="Rev. D, 05/2013", Packing="Tape and Reel", RoHS=Pb-Free, V(BR) Typ (V)=6.7, IR Max (uA)=400
DS1: library part CMP-2000-07124-1, "Yellow LED, Water Clear Len, 585 nm, 2.1 V, -40 to 85 degC, 2-Pin SMD, RoHS, Tape and Reel", Color=Yellow, Current - Test=20mA, Lens Color=Colorless, manufacturer=Lumex, Millicandela Rating=6mcd, Package / Case=1206(3216Metric), Package Description="2-Pin Surface Mount Device, Body 3.2 x 1.5 mm", Standard Package=3,000, Supplier Device Package=1206, Voltage - Forward (Vf) (Typ)=2.1V, Catalog Drawings=SML-LX1206SeriesTopSML-LX1206SeriesSideSML-LX1206SeriesBottomSML-LX1206SeriesFootprint, Category=Optoelectronics, Datasheet URL=http://www.lumex.com/content/files/ProductAttachment/SML-LX1206YC-TR.pdf, Datasheet Version="Rev. K, 08/2012", Family=LEDIndication-Discrete, Features=-, Height (Max)=1.10mm, Lens Style/Size=RectanglewithFlatTop, Lens Transparency=Clear, Manufacturer URL=http://www.lumexinstruments.com/, Mounting Technology=SurfaceMount, Mounting Type=SurfaceMount, Online Catalog=SML-LX1206RectanglewithFlatTop1206PackageLEDs, Other Names=67-1358-2LU60357TRSMLLX1206YCTR, Package Reference=SML-LX1206YC-TR, packaging=Tape&Reel(TR), Product Training Modules=LEDsBenefitsofCustomLEDandLCDTechnology, RoHS Information=RoHSCertofCompliance, series=-, Size / Dimension=3.20mmLx1.60mmW, Viewing Angle=160°, Wavelength - Dominant=-, Wavelength - Peak=585nm
F1 F2: library part CMP-07400-000025-1, "PTC RESET FUSE 30V 120MA 1206", Ambient Temperature Range High=+85°C, Ambient Temperature Range Low=-40°C, Current Rating=10A, Hold Current=0.12A, manufacturer="Bourns Inc.", Manufacturer Part Number=MF-NSMF012-2, Resistance=1.35-8.5Ω, Temperature="-40°C to +85°C", Trip Current=0.29A, Voltage Rating=30V, Automotive=Yes, Automotive Grade="Grade 3", Category=Fuse, componentlink2description=Datasheet, componentlink2url=https://www.bourns.com/docs/Product-Datasheets/mfnsmf.pdf, Device Class L1="Circuit Protection", Device Class L2="PTC Resettable Fuses", Device Class L3=unset, Digikey Description="PTC RESET FUSE 30V 120MA 1206", Height=1.1mm, Lead Free=Yes, Mouser Description="Resettable Fuses - PPTC 0.12A 30V 1.35ohm", Octopart=https://octopart.com/mf-nsmf012-2-bourns-24569, Package=MF-NSMF012-2, RoHS=TRUE, Temperature Range High=+85°C, Temperature Range Low=-40°C, Trip Time=0.2s
FB1: library part MPZ1608D101BTA00, "Ferrite Beads Multi-Layer High Current 600Ohm 25% 100MHz 2.3A 0.06Ohm DCR 0805 Automotive T/R", Case/Package=0805, Current Rating=1.5A, Current Rating (Max)=1A, DC Resistance (DCR)=60mΩ, DC Resistance (DCR) (Max)=150mOhm, Device Package="0603 (1608 Metric)", manufacturer="TDK Corporation", Manufacturer Part Number=BLM21SP601SH1D, Max Operating Temperature=125°C, Min Operating Temperature=-55°C, Operating Temperature="-55°C ~ 125°C", RMS Current (Irms)=2.3A, Supplier Part Number=3227839, Supplier Part Number 1=445-MPZ1608D101BTA00CT-ND, Test Frequency=100MHz, Tolerance=25%, Category="Ferrite Beads and Chips", componentlink1description=Datasheet, componentlink1url=https://product.tdk.com/info/en/catalog/datasheets/beads_commercial_power_mpz1608_en.pdf?ref_disty=digikey, componentlink2description="DigiKey Link", componentlink2url=https://www.digikey.com/en/products/detail/tdk-corporation/MPZ1608D101BTA00/1084520, ComponentLink3Description=https://datasheet.octopart.com:443/BLM21SP601SH1D-Murata-datasheet-180807142.pdf?src-supplier=IHS, ComponentLink3URL=https://datasheet.octopart.com:443/BLM21SP601SH1D-Murata-datasheet-180807142.pdf?src-supplier=IHS, ComponentLink4Description=https://datasheet.octopart.com:443/BLM21SP601SH1D-Murata-datasheet-138707483.pdf?src-supplier=ODG+(Origin+Data+Global), ComponentLink4URL=https://datasheet.octopart.com:443/BLM21SP601SH1D-Murata-datasheet-138707483.pdf?src-supplier=ODG+(Origin+Data+Global), ComponentLink5Description=https://datasheet.octopart.com:443/BLM21SP601SH1D-Murata-datasheet-166171483.pdf?src-supplier=TME, ComponentLink5URL=https://datasheet.octopart.com:443/BLM21SP601SH1D-Murata-datasheet-166171483.pdf?src-supplier=TME, ComponentLink6Description=http://sigma.octopart.com:80/reach_statement/Murata-company-16.pdf?src-supplier=Compliance+Statements, ComponentLink6URL=http://sigma.octopart.com:80/reach_statement/Murata-company-16.pdf?src-supplier=Compliance+Statements, Core Material=Ferrite, ESR=60mΩ, Filter Type="Power Line", Height=850µm, Height (Max)="0.037\" (0.95mm)", lastupdated="3/06/2024 19:51:52", Length=2mm, Lifecycle Status=Active, Minimum Order=1, Mounting Type="Surface Mount", Number of Circuits=1, Number of Lines=1, Number of Terminals=2, Package / Case="0603 (1608 Metric)", packaging=TapeAndReel, Part Number=MPZ1608D101BTA00, Part Status=Active, partid=843, Price=0.02, Pricing="10=0,218, 100=0,151, 500=0,108, 1000=0,0961, 2000=0,0879, 4000=0,0797 (EUR)", REACH SVHC=Yes, RoHS=Compliant, Schedule B="8504500000, 8543706000, 8543706000|8543706000, 8543706000|8543706000|8543706000", series=MPZ, Size / Dimension="0.063\" L x 0.032\" W (1.60mm x 0.80mm)", Stock=12289, Supplier=Farnell, Supplier 1=DigiKey, Width=1.25mm, Impedance=600Ω, Impedance @ Frequency="100 Ohms @ 100 MHz"
J2: "USB Connectors 24 Receptacle 1 8.94*7.3mm RoHS", Package=Package, Availability="Not in stock", Check_prices=https://www.snapeda.com/parts/TYPE-C-31-M-12/HRO+Electronics+Co.%252C+Ltd./view-part/?ref=eda, MF="HRO Electronics Co., Ltd.", MP=TYPE-C-31-M-12, Price=None, SnapEDA_Link=https://www.snapeda.com/parts/TYPE-C-31-M-12/HRO+Electronics+Co.%252C+Ltd./view-part/?ref=snap
J3: Package=None, Availability=Unavailable, MF="{'manufacturer': u'Amphenol ICC (FCI)'}", MP=10067099-200LF, Price=None
J4 J5 J9 J10 J11: "Connector Header Surface Mount 6 position 0.049 (1.25mm)", Package=None, Check_prices=https://www.snapeda.com/parts/BM06B-GHS-TBT(LF)(SN)(N)/JST/view-part/?ref=eda, MF="JST Sales", MP=BM06B-GHS-TBT(LF)(SN)(N), SnapEDA_Link=https://www.snapeda.com/parts/BM06B-GHS-TBT(LF)(SN)(N)/JST/view-part/?ref=snap
J6 J7 J8: "Conn Shrouded Header HDR 4 POS 1.25mm Solder ST Top Entry SMD T/R", Package=None, Check_prices=https://www.snapeda.com/parts/BM04B-GHS-TBT%20(LF)(SN)(N)/JST/view-part/?ref=eda, MF=JST, MP="BM04B-GHS-TBT (LF)(SN)(N)", SnapEDA_Link=https://www.snapeda.com/parts/BM04B-GHS-TBT%20(LF)(SN)(N)/JST/view-part/?ref=snap
R1 R2 R3 R4 R5 R6 R7 R8 R9 R10 R11 R12 R13 R14 R15 R16 R17 R18 R19 R20 R21 R22 R23 R24 R29 R32 R33 R34 R35 R36 R37 R38: library part 0603-Res
R39 R40 R41 R42 R43 R44 R45 R46 R47 R48 R49 R50 R51 R52 R53 R55 R57 R58 R59 R60 R61 R62 R63 R64 R65 R66 R67 R68 R69 R70 R71 R72: library part CMP-2004-00001-2, "Chip Resistor, 0 Ohm, Jumper, 0.05 W, -55 to 155 degC, 0201 (0603 Metric), RoHS, Tape and Reel", Case Code (Metric)=0603, Case Code (Imperial)=0201, Max Operating Temperature="155 degC", Min Operating Temperature="-55 degC", Package Quantity=1, Power Rating="50 mW", Resistance="0 mohm", Tolerance=5%, Voltage Rating="30 V", Case\Package=0201, componentlink1description="Manufacturer URL", componentlink1url=http://www.vishay.com/, componentlink2description=Datasheet, componentlink2url=http://www.vishay.com/docs/20052/crcw0201e3.pdf, DatasheetVersion=03/2016, Height="0.23 mm", Length="0.6 mm", Mount="Surface Mount", Mounting Technology="Surface Mount", PackageDescription="2-Pin Surface Mount Device, Body 0.6 x 0.3 mm", PackageReference=0201, packaging="Cut Tape", Radiation Hardening=No, REACH SVHC=Unknown, RoHSCompliant=true, Weight="6E-06 oz", Width="0.3 mm"
S1 S3: "SWITCH TACTILE SPST-NO 0.05A 16V", Contact Rating @ Voltage="0.05A @ 16VDC", manufacturer=C&K, Operating Force=160gf, Operating Temperature="-40°C ~ 85°C", Supplier Part Number 1=CKN10502CT-ND, Actuator Height off PCB, Vertical=2.50mm, Actuator Orientation="Top Actuated", Actuator Type="Oval Button", Circuit=SPST-NO, componentlink1description=Datasheet, componentlink1url=https://dznh3ojzb2azq.cloudfront.net/products/Tactile/PTS810/documents/datasheet.pdf, componentlink2description="DigiKey Link", componentlink2url=http://digikey.com/product-detail/en/c-k/PTS810-SJM-250-SMTR-LFS/CKN10502CT-ND/4176673, lastupdated="9/04/2020 10:00:13", Lifecycle Status=Active, Minimum Order=1, Mounting Type="Surface Mount", Outline="4.20mm x 3.20mm", packaging=TapeAndReel, Part Number="PTS810 SJM 250 SMTR LFS", Part Status=Active, Price=0.16, series=PTS810, Supplier 1=DigiKey, Switch Function=Off-Mom, Termination Style="J Lead", Illumination=Non-Illuminated
S2: library part SS312SAH4-R, "SWITCH SLIDE SPDT 0.4VA 28V", Part Number=SS312SAH4-R
U1: library part CMP-12105-000145-1, "IC MCU 32BIT 1MB FLASH 100LQFP", Case/Package=LQFP, Frequency=216MHz, Max Operating Temperature=85°C, Min Operating Temperature=-40°C, Core Architecture=ARM, Memory Size=1MB, Memory Type=FLASH, Number of I/Os=82, Oscillator Type=Internal, packaging=Tray, Peripherals="Brown-out Detect/Reset", RoHS Compliant=Yes, Interface=I2C
U2: "High-performance 6-axis inertial sensor (accelerometer + gyroscope) <a href=\"https://pricing.snapeda.com/parts/BMI088/Bosch%20Sensortec/view-part?ref=eda\">Check prices</a>", Package=None, Availability=Unavailable, MP=BMI088, Price=None
U3: "Accelerometer, Gyroscope, 6 Axis Sensor Output", Package=None, Availability=Unavailable, MP=ICM-42688-P, Price=None
U4: "Pressure Sensor 4.35PSI ~ 18.13PSI (30kPa ~ 125kPa) Absolute - - 10-WFLGA", Package=None, Check_prices=https://www.snapeda.com/parts/BMP390L/Bosch+Sensortec/view-part/?ref=eda, MF="Bosch Sensortec", MP=BMP390L, SnapEDA_Link=https://www.snapeda.com/parts/BMP390L/Bosch+Sensortec/view-part/?ref=snap
U5: library part CMP-0315-00015-3, "IC TRANSCEIVER HALF 1/1 8SOIC", Case/Package=D, Max Operating Temperature=85°C, Max Supply Current=17mA, Max Supply Voltage=3.6V, Min Operating Temperature=-40°C, Min Supply Voltage=3V, Operating Supply Voltage=3.3V, Package Quantity=1, Contact Plating=Gold, Data Rate=1Mbps, Lead Free="Lead Free", Nominal Supply Current=17mA, Number of Drivers=1, Number of Pins=8, Number of Receive Buffers=1, Number of Receivers=1, Number of Transceivers=1, Number of Transmit Buffers=1, Number of I/Os=2, packaging="Tape and Reel", Radiation Hardening=No, REACH SVHC="No SVHC", Termination=SMD/SMT, Weight=0.002561oz
Y1: library part "TSX-3225 24.0000MF15X-AC6", "CRYSTAL 24.0000MHZ 9PF SMD", ESR (Equivalent Series Resistance)="40 Ohms", Frequency Stability=±15ppm, Frequency Tolerance=±10ppm, Load Capacitance=9pF, manufacturer=EPSON, Operating Mode=Fundamental, Operating Temperature="-40°C ~ 85°C", Package / Case="4-SMD, No Lead", Supplier Part Number 1=SER4180CT-ND, componentlink1description=Datasheet, componentlink1url=https://support.epson.biz/td/api/doc_check.php?dl=brief_TSX-3225&lang=en, componentlink2description="DigiKey Link", componentlink2url=https://www.digikey.com/en/products/detail/epson/TSX-3225-24-0000MF15X-AC6/5261221, Frequency="24 MHz", Height - Seated (Max)="0.024\" (0.60mm)", lastupdated="3.06.2024 20:02:15", Lifecycle Status=Active, Minimum Order=1, Mounting Type="Surface Mount", packaging=TapeAndReel, Part Number="TSX-3225 24.0000MF15X-AC6", Part Status=Active, partid=432, Price=0.20, series=TSX-3225, Size / Dimension="0.126\" L x 0.098\" W (3.20mm x 2.50mm)", Supplier 1=DigiKey, Type="MHz Crystal"
Y2: library part ABS07-32.768KHZ-7-T, "CRYSTAL 32.7680KHZ 7PF SMD", Part Number=ABS07-32.768KHZ-7-T

## Free pads (board coordinates)
  round 5 hole 4.2: 2(14.75,14.623) 2(14.75,45.123) 2(45.25,14.623) 2(45.25,45.123)

## Via types
v1: diameter 0.45, hole 0.3, Top Layer to Bottom Layer, 180 vias
v2: diameter 0.7, hole 0.4, Top Layer to Bottom Layer, 6 vias

## Nets (pads, with @x,y where several pads share a name; then routed paths per layer and width w, separated by ;. In a path a pad name is that pad's centre, name@x,y a point inside that pad or via, vN(x,y) a via of type N, cw(c..) or ccw(c..) an arc to the next point about the centre after c; other vN are vias at no path point)
"3.3 V": B1.5 B1.6 B1.7 C7.2 C8.2 C9.2 C10.2 C11.2 C12.2 C13.2 C19.2 C20.2 C21.2 C22.2 C23.2 C24.2 C25.2 C26.1 C27.1 C30.2 C33.2 C34.2 C37.1 FB1.1 J3.4 P2.5 R1.1 R5.2 R6.2 R10.2 R11.2 R12.2 R16.2 R17.1 R18.1 R19.2 R20.2 R21.2 R22.2 R23.2 R52.1 R53.1 S2.1 U1.6 U1.11 U1.50 U1.75 U1.100 U2.3 U2.11 U3.5 U3.8 U4.1 U4.6 U4.10 U5.3 U6.2 U6.4 U6.13 | length 78.6
  Top Layer w0.15: R52.1@24.13,17.988 24.111,17.969 24.111,16.873 24.243,16.741 24.411,16.741 24.511,16.641 R53.1@24.511,16.591 25.044,16.591 ; v1(24.892,16.256) 24.948,16.312 24.948,16.496 25.044,16.591 ; C10.2@25.532,17.03 25.482,17.03 25.044,16.591 ; v1@42.71,21.933 42.71,21.679 44.867,19.522 47.449,19.522 P2.5@48.374,20.447
  Top Layer w0.25: v1(11.811,31.203) 11.811,31.149 11.93,31.03 11.93,30.735 R16.2@12.18,30.485 ; R12.2@12.688,42.55 13.33,42.55 v1(13.589,42.291) ; FB1.1@14.478,20.501 14.478,19.812 15.24,19.05 v1(16.002,19.05) ; v1(15.113,40.132) 15.113,39.364 C19.2@15.108,39.358 15.158,39.358 15.519,38.997 U2.3@16.361,38.997 ; v1(18.669,43.815) 19.596,43.815 19.971,44.19 S2.1@19.971,44.8 ; U2.11@18.691,39.997 20.03,39.997 20.201,39.827 20.201,39.617 20.315,39.503 20.315,39.405 v1(20.354,39.367) ; v1(19.05,32.893) 19.423,32.52 19.423,32.259 C7.2@19.673,32.009 ; C13.2@19.165,28.961 19.229,29.025 19.229,29.075 19.602,29.448 19.602,29.553 v1(19.64,29.591) ; C13.2@19.292,28.961 20.202,28.961 20.35,28.813 U1.11@21.712,28.813 ; C7.2@19.673,31.755 20.315,31.755 20.757,31.313 U1.6@21.712,31.313 ; v1(22.225,37.084) C12.2@23.108,37.084 ; C12.2@23.246,37.096 23.337,37.005 U1.100@23.337,35.438 ; R10.2@23.888,40.381 24.138,40.131 24.138,39.67 24.257,39.551 v1(24.257,39.497) ; v1(25.146,41.656) 25.2,41.656 25.569,42.025 U6.13@26.411,42.025 ; R11.2@26.675,37.731 26.918,37.973 v1(27.559,37.973) 27.575,37.989 27.575,38.607 C30.2@27.825,38.857 C30.2@27.825,38.907 ; U6.2@27.436,40 27.436,39.295 C30.2@27.825,38.907 ; U6.4@28.436,40 28.411,39.975 28.411,39.493 C30.2@27.825,38.907 ; v1(33.655,14.605) 33.655,13.849 R6.2@33.667,13.838 ; v1(34.163,38.905) 34.163,39.357 U5.3@34.295,39.489 ; U1.50@35.337,20.188 35.337,19.481 35.603,19.215 37.128,19.215 C9.2@37.333,19.419 37.344,19.431 v1(38.354,19.431) ; v1(35.433,11.684) 35.471,11.722 35.869,11.722 36.453,12.306 U4.6@36.453,12.318 ; R5.2@36.818,14.737 R5.2@36.953,14.603 ; U4.1@36.953,13.844 U4.1@36.953,13.856 ; R5.2@36.953,14.857 U4.1@36.953,13.856 ; U1.75@36.962,33.813 37.665,33.813 37.963,34.112 38.243,34.112 C11.2@38.479,34.348 ; U4.10@37.466,13.581 38.302,13.581 38.553,13.831 C24.2@38.603,13.831 38.614,13.843 v1(39.497,13.843) ; v1(37.719,35.433) 37.757,35.395 37.757,35.07 C11.2@38.479,34.348 ; C23.2@37.846,14.992 v1(37.846,15.748) ; C23.2@37.858,14.981 37.608,14.731 37.608,14.511 U4.1@36.953,13.856 ; C11.2@38.493,34.285 38.493,34.335 C11.2@38.479,34.348 ; v1(40.641,26.544) 41.032,26.151 41.292,26.151 C20.2@41.541,25.903 41.541,24.845 U3.8@41.491,24.795 ; v1(40.641,26.544) 41.027,26.93 41.298,26.93 C22.2@41.541,27.173 ; U3.5@41.656,23.13 41.706,23.08 41.826,23.08 42.024,22.882 42.667,22.882 C21.2@42.677,22.872 42.672,22.866 v1(42.672,21.971) v1@42.71,21.933 ; P2.5@48.374,20.447 P2.5@48.574,20.447
  Bottom Layer w0.15: R1.1@17.407,28.189 17.407,28.239 18.76,29.591 v1(19.64,29.591)
  Bottom Layer w0.25: R19.2@27.559,33.02 27.571,33.008 R20.2@27.571,31.755 R21.2@27.571,30.485 R22.2@27.571,27.056 R23.2@27.571,25.786 ; C26.1@33.528,39.624 33.578,39.624 33.828,39.374 33.828,39.264 33.998,39.094 ; J3.4@34.163,29.083 35.119,29.083 35.322,29.286 35.322,29.727 C33.2@35.572,29.977 35.572,30.027 36.222,30.677 37.353,30.677 37.611,30.419 38.561,30.419 38.589,30.391 38.824,30.391 v1(38.862,30.353) ; v1(34.163,38.905) 34.201,38.943 34.201,39.077 34.748,39.624 C27.1@34.798,39.624 ; R18.1@37.079,43.426 R17.1@38.222,43.426 39.054,43.426 39.189,43.561 v1(39.243,43.561)
  other v1: 24.003,13.716 23.912,16.009 24.384,16.129 27.571,28.771
5V: B1.2 B1.3 B1.4 C38.1 C39.1 D1.K D4.K J5.1 J6.1 J7.1 J8.1 J9.1 J10.1 J11.5 P1.6 | length 114.5
  Top Layer w0.25: v2(11.561,21.717) 11.561,20.824 14.097,18.288 15.748,18.288 v2(17.272,16.764) ; v1(23.749,12.254) 27.495,12.254 29.591,14.35 J5.1@29.591,14.9 ; J9.1@31.016,44.529 31.016,46.383 31.877,47.244 33.492,47.244 v2(33.883,46.853) ; D1.K@43.146,29.845 43.303,29.688 J6.1@44.91,29.688 46.003,29.688 v1(46.548,29.143) ; D1.K@43.146,29.972 43.206,29.972 43.641,30.407 43.641,30.467 45.974,32.8 v2(45.974,35.687)
  Bottom Layer w0.25: v2(11.561,21.717) 11.561,25.335 13.565,27.339 13.565,30.835 13.327,31.073 13.327,34.79 14.195,35.658 15.104,35.658 J7.1@15.24,35.794 15.24,37.211 17.145,39.116 17.145,43.434 18.66,44.949 18.66,46.468 19.817,47.625 23.439,47.625 25.985,45.079 J10.1@25.985,44.529 28.996,44.529 31.32,46.853 v2(33.883,46.853) ; C38.1@17.137,17.785 17.272,17.65 v2(17.272,16.764) B1.4@18.648,16.764 ; B1.2@18.648,14.224 18.21,14.224 17.28,13.294 C39.1@17.28,11.933 17.423,11.79 17.423,11.279 17.653,11.049 P1.6@22.95,11.049 22.95,11.371 23.711,12.132 23.711,12.216 v1(23.749,12.254) ; J8.1@35.657,44.529 35.657,45.079 v2(33.883,46.853) ; J11.5@45.037,28.313 45.06,28.336 46.116,28.336 46.509,28.729 46.509,29.105 v1(46.548,29.143) ; v2(45.974,35.687) 42.39,39.271 42.39,41.121 38.926,44.585 38.274,44.585 36.006,46.853 v2(33.883,46.853)
BOOT: P2.4 R2.2 U1.94 | length 40.5
  Top Layer w0.15: R2.2@23.991,42.423 24.251,42.164 v1(24.638,42.164) ; v1@26.426,36.82 26.366,36.761 26.366,36.242 26.357,36.232 26.357,35.458 U1.94@26.337,35.438 26.337,31.24 36.957,20.62 43.345,20.62 44.793,19.172 47.598,19.172 47.842,18.928 48.523,18.247 P2.4@48.574,18.247
  Bottom Layer w0.15: v1(24.638,42.164) 25.4,42.164 26.416,41.148 v1(26.416,36.83)
DN: D2.6 U1.70 | length 8
  Top Layer w0.15: U1.70@36.962,31.313 36.996,31.28 37.697,31.28 38,30.976 38.297,30.976 v1(38.354,30.919) ; v1(40.201,35.306) 40.144,35.363 40.144,35.585 40.132,35.597 40.132,35.683 40.398,35.949 D2.6@40.525,35.949
  Bottom Layer w0.15: v1(38.354,30.919) 39.048,30.919 40.201,32.072 v1(40.201,35.306)
DP: D2.4 U1.71 | length 8.5
  Top Layer w0.15: U1.71@36.962,31.813 37.664,31.813 38.108,31.369 v1(38.862,31.369) ; v1(39.751,36.248) 39.808,36.305 39.808,36.478 40.205,36.874 40.525,36.874 D2.4@40.539,36.888
  Bottom Layer w0.15: v1(38.862,31.369) 39.751,32.258 v1(39.751,36.248)